# Altium PCB zbook-rf-shields-BLE-P1.PcbDoc
Units mm, origin at the board's own origin, x right, y up, seen from the top; angles counter-clockwise.
Board outline 19 x 27 mm, 4 copper layers (Top Layer, GND, PWR, Bottom Layer), stack 1.597 mm thick; 25 components, 22 nets, 89 pads, 22 vias.
Unrouted connection lines stored in the file: 2.
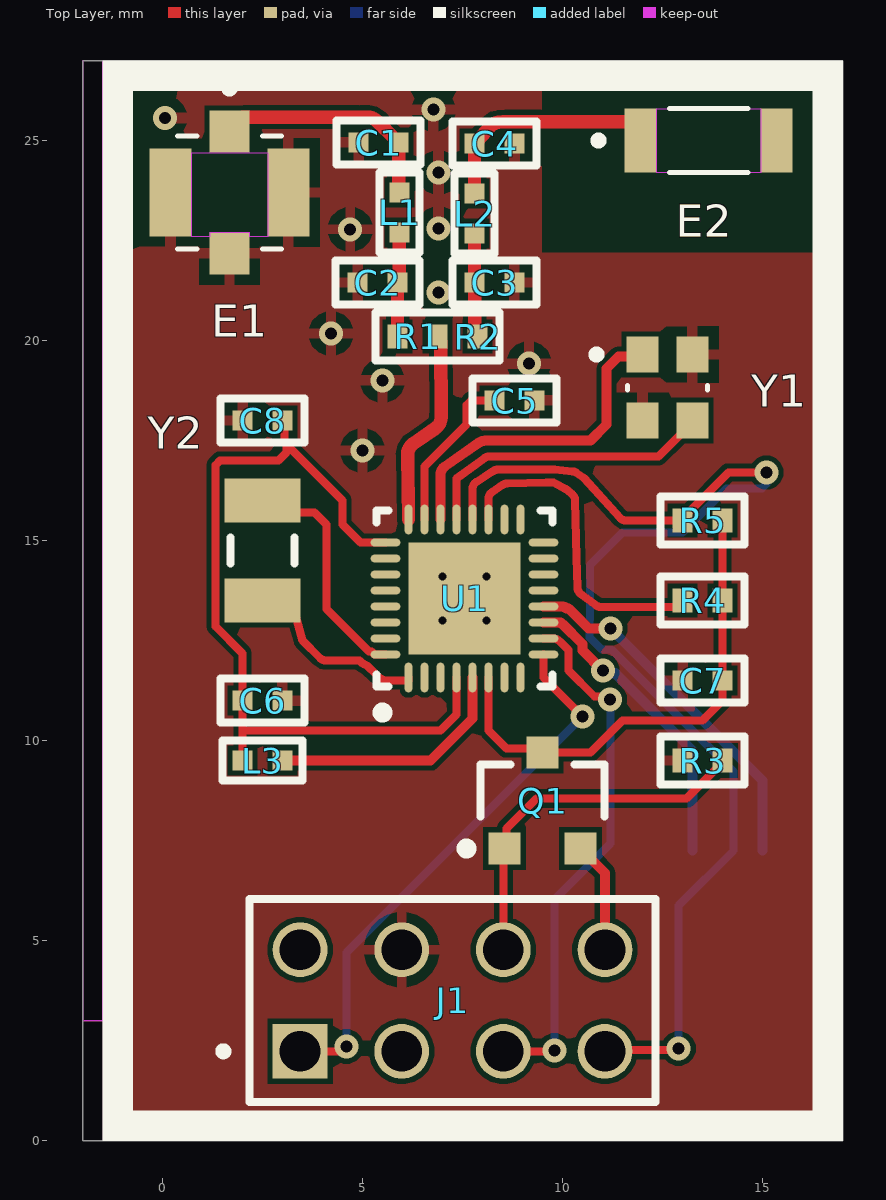
[diagram p0: Top Layer view]
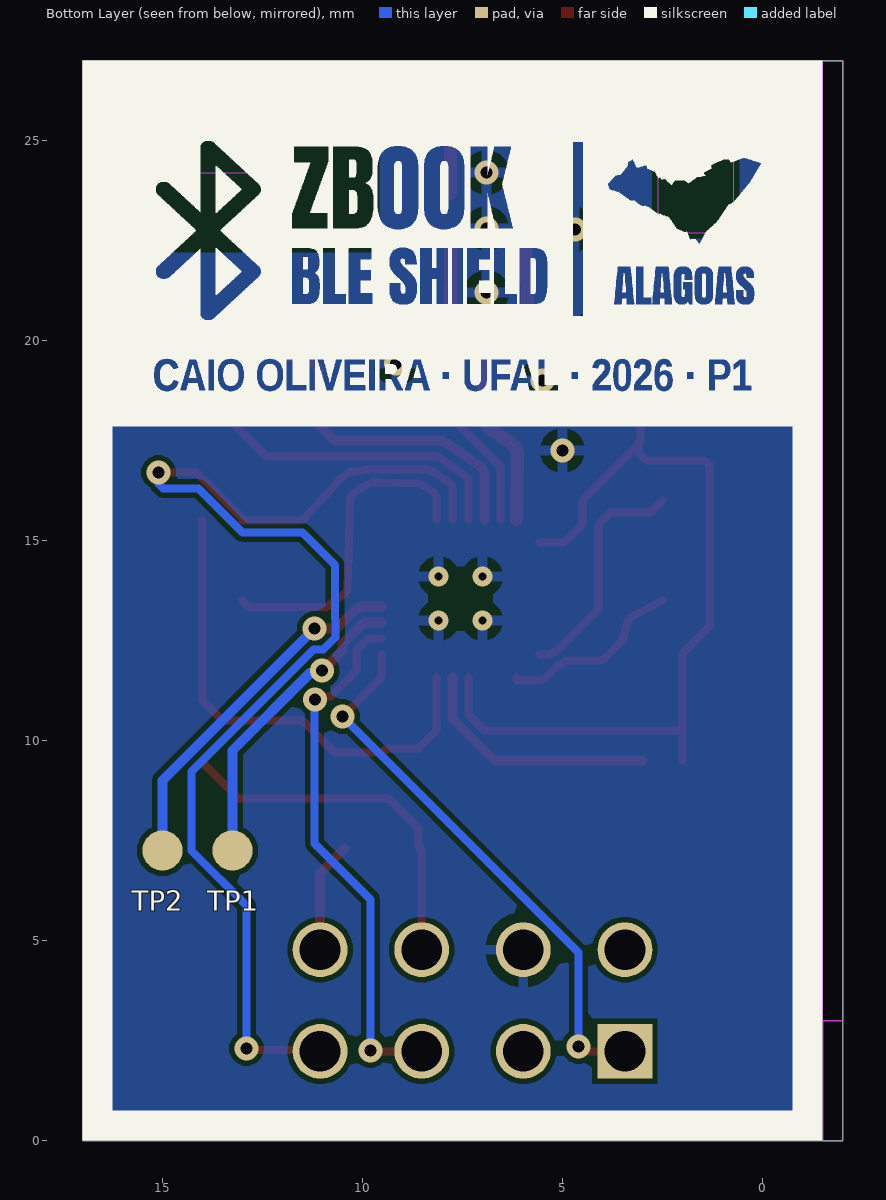
[diagram p1: Bottom Layer view, seen from below]
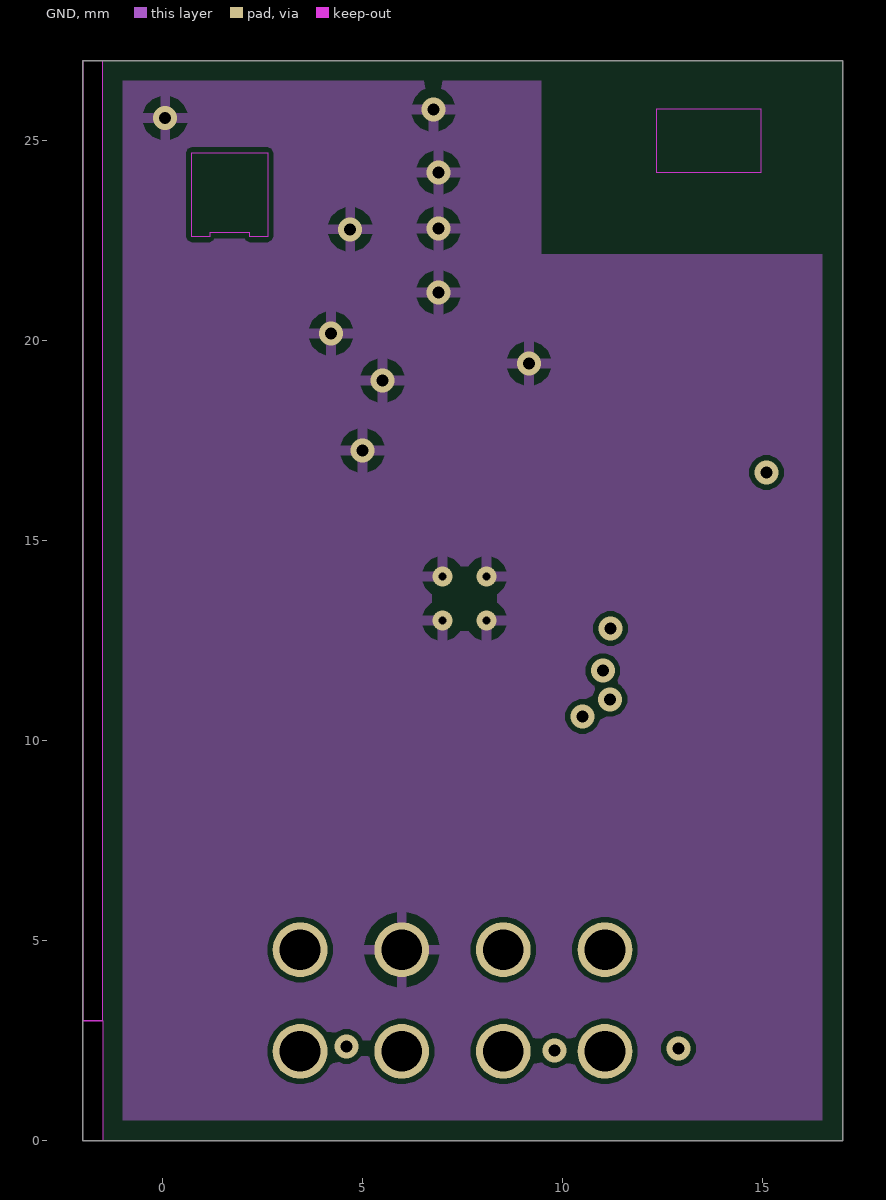
[diagram p2: GND]
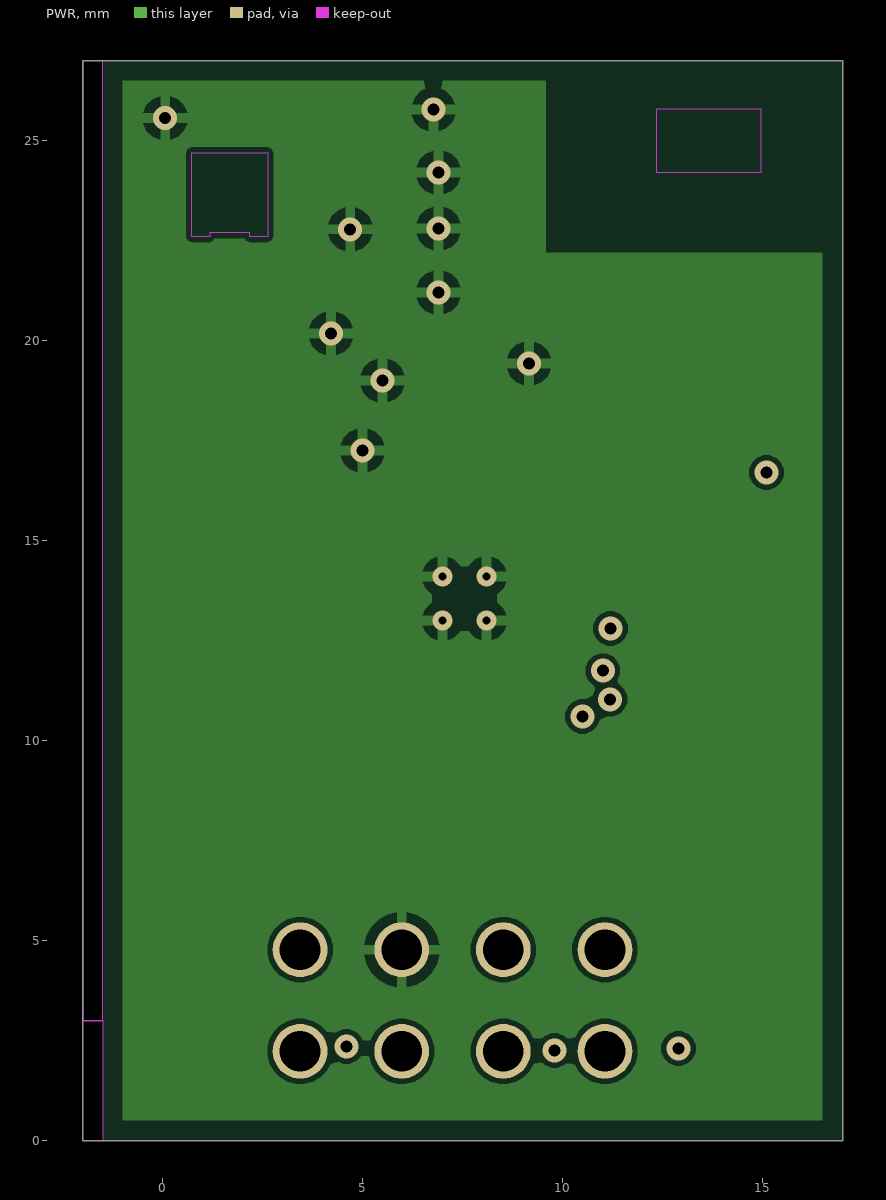
[diagram p3: PWR]
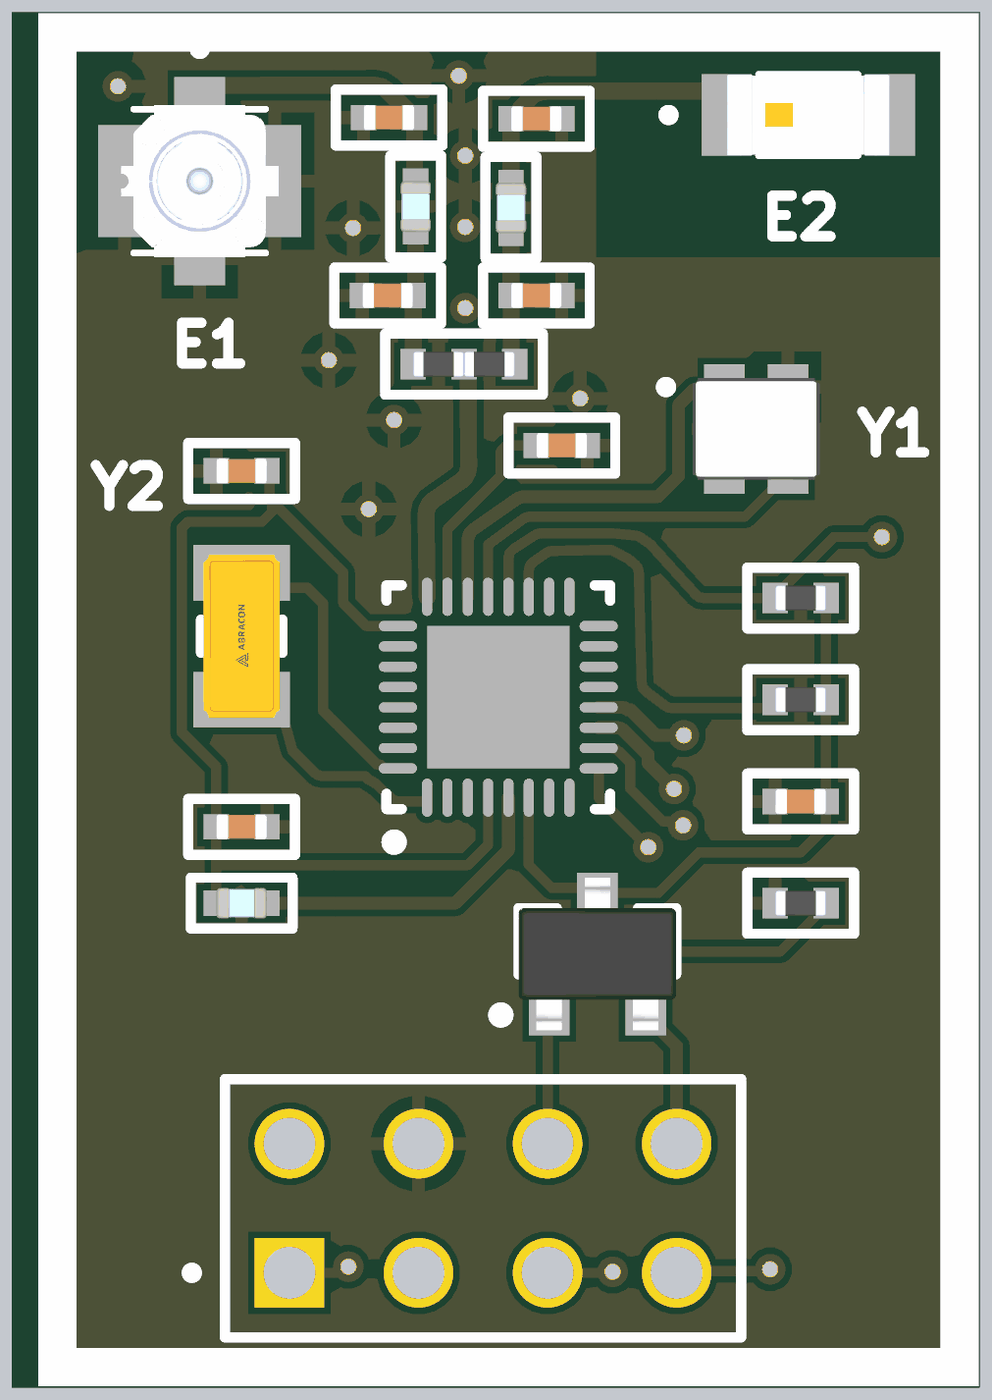
[diagram p4: 3D render of the assembled board from above, using the file's embedded part models]

## Layer stack, top to bottom
Top Solder: solder mask 0.0102, Solder Resist, Dk 3.5
Top Layer: signal copper 0.0175
Dielectric 2: prepreg 0.196, PP-006, Dk 4.74
GND: signal copper 0.035
Dielectric 1: core 1.1, Core-036, Dk 4.6
PWR: signal copper 0.035
Dielectric 3: prepreg 0.196, PP-006, Dk 4.74
Bottom Layer: signal copper 0.0175
Bottom Solder: solder mask 0.0102, Solder Resist, Dk 3.5

## Board outline
-2,0 -2,27 17,27 17,0
cut-out: -1.5,27 -2,27 -2,3 -1.5,3 -2,3 -1.5,3
cut-out: -1.5,0 -2,0 -2,3 -1.5,3

## Design rules (kind name [scope] priority, off if disabled: settings)
BoardOutlineClearance [All] p1: gap=0.5 ignorepadtopadclearanceinfootprint=FALSE except(0: Arc-SplitContinuation Track-SplitContinuation SMDPad-SplitContinuation THPad-SplitContinuation Via-SplitContinuation Fill-SplitContinuation Poly-SplitContinuation Region-SplitContinuation Text-SplitContinuation)
Clearance [All] p1: gap=0.127 ignorepadtopadclearanceinfootprint=FALSE
ComponentClearance [All] p1 off: gap=0.254 collisioncheckmode=3 verticalgap=0.254 showdistances=FALSE
PolygonConnect [All] p1: connectstyle=Relief reliefconductorwidth=0.254 reliefentries=4 polygonreliefangle="90 Angle" airgapwidth=0.254
ReturnPath ReturnPath_IMP50 [InNetClass('IMP50')] p1: impedanceprofileid={6CFC5C45-C699-41E6-A985-3513A1A8B816} _gaplimit=0 _useantipads=TRUE
RoutingVias [All] p1: holewidth=0.3 width=0.6 viastyle="Through Hole" minholewidth=0.3 minwidth=0.6 maxholewidth=0.3 maxwidth=0.6
SolderMaskExpansion Tenting_Vias [IsVia] p1: expansion=0 istentingtop=TRUE
SolderMaskExpansion [All] p2: expansion=0 istentingtop=FALSE
SupplyNets "Schematic Supply Nets_2" [InNet('GND')] p1: voltage=0.000
SupplyNets "Schematic Supply Nets_1" [InNet('VCC')] p2: voltage=0.000
SupplyNets "Schematic Supply Nets" [InNet('VDC')] p3: voltage=0.000
Width Width_IMP50 [InNetClass('IMP50')] p1: maxlimit=0.335 minlimit=0.217 preferedwidth=0.335 toplayer_minwidth=0.335 midlayer1_maxwidth=0.217 midlayer1_prefwidth=0.217 midlayer2_maxwidth=0.217 midlayer2_prefwidth=0.217 bottomlayer_minwidth=0.335 impedanceprofiledriven=TRUE impedanceprofileid={6CFC5C45-C699-41E6-A985-3513A1A8B816} impedanceprofilevalue=50.000000 minimp=50.000000 maximp=50.000000 favimp=50.000000
Width [All] p2: maxlimit=2 minlimit=0.2 preferedwidth=0.2 minimp=50.000000 maximp=50.000000 favimp=50.000000
29 further rules are at their usual default settings.

## Classes and differential pairs
net class IMP50: NetC1_2 NetC2_2 NetC3_2 NetC4_2 NetR1_1
component class "[03] - BLE MODULE AND CONNECTIONS": C1 C2 C3 C4 C5 C6 C7 C8 E1 E2 J1 L1 L2 L3 Q1 R3 R4 R5 TP1 TP2 U1 Y2

## Components (designator, comment, footprint, x,y, rotation, side; value= is the part's Value field where it differs from the comment)
C1 "NC" C0402#1 5.4,24.95 r0 top
C2 "NC" C0402#1 5.375,21.45 r0 top
C3 "NC" C0402#2 8.3,21.45 r180 top
C4 "NC" C0402#2 8.3,24.925 r180 top
C5 "0.47 uF" C0402#1 8.8,18.5 r180 top
C6 "0.1 uF" C0402#1 2.5,11 r180 top
C7 "2.2 uF" C0402#1 13.5,11.5 r0 top
C8 "4.7 uF" C0402#1 2.5,18 r0 top
E1 "20441-001E-01" IPEX_20441-001E-01 1.675,23.7 r180 top
E2 "2450AT18A0100001E" XCVR_2450AT18A0100001E 13.65,25 r0 top
J1 "MTSW-104-07-T-D-240-LL" SAMTEC_MTSW-104-07-T-D-240-LL 7.25,3.5 r0 top
L1 "0R" L0402 5.925,23.2 r270 top
L2 "0R" L0402 7.8,23.175 r90 top
L3 "10uH" L0402 2.5,9.5 r180 top
Q1 "AO3401A" AO-SOT-23-3L_V 9.5,8.5 r90 top
R1 "0 R" R0402#1 6.375,20.1 r180 top
R2 "0 R" R0402#2 7.375,20.1 r0 top
R3 "10K" R0402#1 13.5,9.5 r0 top
R4 "10K" R0402#1 13.5,13.5 r0 top
R5 "10K" R0402#1 13.5,15.5 r0 top
TP1 "TestPoint" "Test Point" 15,7.25 r90 top
TP2 "TestPoint" "Test Point" 13.25,7.25 r90 top
U1 "CH592X" QFN40P400X400X80_HS-33N 7.55,13.55 r90 top
Y1 "ABM10-32.000MHZ-D30-T3" XTAL_ABM10-32.000MHZ-D30-T3 12.625,18.825 r0 top
Y2 "ABS07-32.768KHZ-T" FP-ABS07-MFG 2.5,14.75 r90 top

## Footprints (in the part's own frame and the unit in brackets; to place one, negate y for a bottom-side part, rotate by r counter-clockwise, add the part's x,y. Pads: shape width x height; smd on the part's side, far side on the other; paste and mask are expansions set on the pad)
AO-SOT-23-3L_V [mm] "SOT23, 3-Leads, Body 3.1x1.8mm, Pitch 0.95mm"
  rect 0.8x0.8 smd: 1(-1.2,0.95) 2(-1.2,-0.95) 3(1.2,0)
  silkscreen extent -1.32,-1.55 0.9,2.02, body extent -1.5,-1.55 1.5,1.55, height 1.25
C0402#1 [mm]
  rect 0.5x0.5 smd: 1(-0.5,0) 2(0.5,0)
  silkscreen extent -1.05,-0.55 1.05,0.55, body extent -0.5,-0.25 0.5,0.25, height 0.51
C0402#2 [mm]
  rect 0.5x0.5 smd mask+0: 1(-0.5,0)
  rect 0.5x0.5 smd: 2(0.5,0)
  silkscreen extent -1.05,-0.55 1.05,0.55, body extent -0.5,-0.25 0.5,0.25, height 0.51
FP-ABS07-MFG [mm]
  rect 1.1x1.9 smd paste+0 mask+0: 1(-1.25,0) 2(1.25,0)
  silkscreen extent -0.32,-0.8 0.33,0.8, body extent -1.9,-1.05 1.9,1.05, height 0.25
IPEX_20441-001E-01 [mm]
  rect 1x1.05 smd: 1(0,-1.525) G2(0,1.525)
  rect 1.05x2.2 smd: G1(-1.475,0) G3(1.475,0)
  Keep-Out Layer region: 0.95,-1 -0.95,-1 -0.95,1.1 -0.5,1.1 -0.5,1 0.5,1 0.5,1.1 0.95,1.1
  silkscreen extent -1.3,-2.7 1.3,1.41, body extent -1.5,-1.55 1.5,1.55, height 1.25
L0402 [mm]
  rect 0.5x0.5 smd: 1(-0.5,0) 2(0.5,0)
  silkscreen extent -1,-0.5 1,0.5, body extent -0.5,-0.3 0.5,0.3, height 0.51
QFN40P400X400X80_HS-33N [mm] "QFN, 32-Leads, Body 4,00x4,00mm, Pitch 0,40mm, Thermal Pad 2,80x2,80mm, IPC Medium Density"
  rect 2.8x2.8 smd: 0(0,0)
  oval 0.75x0.2 smd: 1(-1.975,1.4) 2(-1.975,1) 3(-1.975,0.6) 4(-1.975,0.2) 5(-1.975,-0.2) 6(-1.975,-0.6) 7(-1.975,-1) 8(-1.975,-1.4) 17(1.975,-1.4) 18(1.975,-1) 19(1.975,-0.6) 20(1.975,-0.2) 21(1.975,0.2) 22(1.975,0.6) 23(1.975,1) 24(1.975,1.4)
  oval 0.2x0.75 smd: 9(-1.4,-1.975) 10(-1,-1.975) 11(-0.6,-1.975) 12(-0.2,-1.975) 13(0.2,-1.975) 14(0.6,-1.975) 15(1,-1.975) 16(1.4,-1.975) 25(1.4,1.975) 26(1,1.975) 27(0.6,1.975) 28(0.2,1.975) 29(-0.2,1.975) 30(-0.6,1.975) 31(-1,1.975) 32(-1.4,1.975)
  silkscreen extent -2.97,-2.2 2.2,2.2, body extent -2.54,-2.54 2.54,2.54, height 0.25
R0402#1 [mm]
  rect 0.5x0.6 smd: 1(-0.5,0) 2(0.5,0)
  silkscreen extent -1.05,-0.6 1.05,0.6, body extent -0.5,-0.25 0.5,0.25, height 0.41
R0402#2 [mm]
  rect 0.5x0.6 smd: 2(0.5,0)
  silkscreen extent -1.05,-0.6 1.05,0.6, body extent -0.5,-0.25 0.5,0.25, height 0.41
SAMTEC_MTSW-104-07-T-D-240-LL [mm]
  rect 1.37x1.37 / inner round 1.37 / far side rect 1.37x1.37 hole 1.02: 01(-3.81,-1.27)
  round 1.37 hole 1.02: 02(-3.81,1.27) 03(-1.27,-1.27) 04(-1.27,1.27) 05(1.27,-1.27) 06(1.27,1.27) 07(3.81,-1.27) 08(3.81,1.27)
  silkscreen extent -5.83,-2.54 5.08,2.54
"Test Point" [mm]
  round 1 smd far side paste-1: 1(0,0)
XCVR_2450AT18A0100001E [mm]
  rect 0.8x1.6 smd: 1(-1.7,0) 2(1.7,0)
  Keep-Out Layer region: 1.3,-0.8 -1.3,-0.8 -1.3,0.8 1.3,0.8
  Keep-Out Layer region: 1.3,-0.8 -1.3,-0.8 -1.3,0.8 1.3,0.8
  silkscreen extent -2.85,-0.8 0.98,0.8, body extent -1.6,-0.8 1.6,0.8, height 1.4
XTAL_ABM10-32.000MHZ-D30-T3 [mm]
  rect 0.8x0.9 smd: 1(-0.625,0.825) 2(-0.625,-0.825) 3(0.625,-0.825) 4(0.625,0.825)
  silkscreen extent -1.87,-0.06 1,0.92, body extent -1.25,-1 1.25,1, height 0.7

## Part data
C1 C2 C3 C4: library part MLCC_0402_NC, "MLCC - NC 0402", Manufacturer Part Number 1=DNP, .Mounting=SMT, .PCBChecked=NO, .SCHChecked=NO
C5: library part "MLCC_0402_0.47 uF", "MLCC - 0.47 uF 0402", .Mounting=SMT, .PCBChecked=NO, .SCHChecked=NO
C6: library part "MLCC_0402_0.1 uF", "MLCC - 0.1 uF 0402", .Mounting=SMT, .PCBChecked=NO, .SCHChecked=NO
C7: library part "MLCC_0402_2.2 uF", "MLCC - 2.2 uF 0402", .Mounting=SMT, .PCBChecked=NO, .SCHChecked=NO
C8: library part "MLCC_0402_4.7 uF", "MLCC - 4.7 uF 0402", .Mounting=SMT, .PCBChecked=NO, .SCHChecked=NO
E1: "CONN - U.FL RF Receptacle SMD", Frequency=9GHz, Manufacturer 1=I-PEX, Max Operating Temperature=90°C, Min Operating Temperature=-40°C, Supplier Part Number=5378-20441-001E-01DKR-ND, Voltage Rating=60V, .Mounting=SMT, .PCBChecked=NO, .SCHChecked=NO, Category="RF / Coaxial Connectors", ComponentLink1Description=https://datasheet.octopart.com:443/20441-001E-01-I-PEX-datasheet-180039539.pdf?src-supplier=IHS, ComponentLink1URL=https://datasheet.octopart.com:443/20441-001E-01-I-PEX-datasheet-180039539.pdf?src-supplier=IHS, Contact Material="Gold, Nickel", Export Control Classification Number (ECCN) Code=EAR99, Fastening Type=Snap, Gender=Male, Harmonized Tariff Schedule (HTS) Code=8536.69.40.10, Height=1.45mm, Impedance=50Ω, Lifecycle Status=Production, Manufacturer Part Number 1=20441-001E-01, Number of Contacts=1, Number of Positions=1, Orientation=Straight, Pricing="1=1,04, 10=0,882, 25=0,8268, 50=0,7872, 100=0,7495, 250=0,70256, 500=0,669, 1000=0,63705, 2500=0,59717 (USD)", REACH SVHC=Unaffected, RoHS=Compliant, Stock=35351, Supplier=DigiKey
E2: "ANTENNA - 2.4GHz Chip 1206", Clock Frequency=2.5GHz, Manufacturer 1="Johanson Technology", Max Operating Temperature=125°C, Min Operating Temperature=-40°C, Power Rating=2W, Supplier Part Number=712-2450AT18A0100001EDKR-ND, .Mounting=SMT, .PCBChecked=NO, .SCHChecked=NO, Bandwidth=100MHz, Category="RF Antennas", ComponentLink1Description=https://datasheet.octopart.com:443/2450AT18A0100001E-Johanson-datasheet-137404838.pdf?src-supplier=Upverter, ComponentLink1URL=https://datasheet.octopart.com:443/2450AT18A0100001E-Johanson-datasheet-137404838.pdf?src-supplier=Upverter, ComponentLink2Description=https://datasheet.octopart.com:443/2450AT18A0100001E-Johanson-datasheet-101575227.pdf?src-supplier=Newark, ComponentLink2URL=https://datasheet.octopart.com:443/2450AT18A0100001E-Johanson-datasheet-101575227.pdf?src-supplier=Newark, Country of Origin=Taiwan, Export Control Classification Number (ECCN) Code=EAR99, Gain=0.5dB, Harmonized Tariff Schedule (HTS) Code=8529.10, Height=1.4mm, Impedance=50Ω, Introduction Date=2024-07-01, Lifecycle Status=Production, Manufacturer Part Number 1=2450AT18A0100001E, Number of Bands=1, Pricing="1=0,52, 10=0,446, 25=0,4196, 100=0,384, 250=0,36244, 500=0,3472, 1000=0,3328 (USD)", REACH SVHC=Unaffected, Return Loss=9.5dB, RoHS=Compliant, Stock=203443, Supplier=DigiKey
J1: "CONN - Header 2x4 2.54mm THT", Manufacturer 1=Samtec, Manufacturer Lifecycle Status=PRODUCTION, Supplier Part Number=612-MTSW-104-07-T-D-240-LL-ND, .Mounting=THT, .PCBChecked=NO, .SCHChecked=NO, Category="Headers and Wire Housings", ComponentLink1Description=https://datasheet.octopart.com:443/MTSW-104-07-T-D-240-LL-Samtec-datasheet-97134619.pdf?src-supplier=Samtec, ComponentLink1URL=https://datasheet.octopart.com:443/MTSW-104-07-T-D-240-LL-Samtec-datasheet-97134619.pdf?src-supplier=Samtec, ComponentLink2Description=https://sigma.octopart.com:443/97134620/technical_drawing/Samtec-MTSW-104-07-T-D-240-LL.pdf?src-supplier=Samtec, ComponentLink2URL=https://sigma.octopart.com:443/97134620/technical_drawing/Samtec-MTSW-104-07-T-D-240-LL.pdf?src-supplier=Samtec, ComponentLink3Description=https://datasheet.octopart.com:443/MTSW-104-07-T-D-240-LL-Samtec-datasheet-118493423.pdf?src-supplier=Electro+Sonic, ComponentLink3URL=https://datasheet.octopart.com:443/MTSW-104-07-T-D-240-LL-Samtec-datasheet-118493423.pdf?src-supplier=Electro+Sonic, ComponentLink4Description=https://datasheet.octopart.com:443/MTSW-104-07-T-D-240-LL-Samtec-datasheet-86819181.pdf?src-supplier=Sager+Electronics, ComponentLink4URL=https://datasheet.octopart.com:443/MTSW-104-07-T-D-240-LL-Samtec-datasheet-86819181.pdf?src-supplier=Sager+Electronics, ComponentLink5Description=https://datasheet.octopart.com:443/MTSW-104-07-T-D-240-LL-Samtec-datasheet-166224765.pdf?src-supplier=Sager+Electronics, ComponentLink5URL=https://datasheet.octopart.com:443/MTSW-104-07-T-D-240-LL-Samtec-datasheet-166224765.pdf?src-supplier=Sager+Electronics, ComponentLink6Description=https://datasheet.octopart.com:443/MTSW-104-07-T-D-240-LL-Samtec-datasheet-158401026.pdf?src-supplier=Sager+Electronics, ComponentLink6URL=https://datasheet.octopart.com:443/MTSW-104-07-T-D-240-LL-Samtec-datasheet-158401026.pdf?src-supplier=Sager+Electronics, ComponentLink7Description=https://datasheet.octopart.com:443/MTSW-104-07-T-D-240-LL-Samtec-datasheet-151470471.pdf?src-supplier=Sager+Electronics, ComponentLink7URL=https://datasheet.octopart.com:443/MTSW-104-07-T-D-240-LL-Samtec-datasheet-151470471.pdf?src-supplier=Sager+Electronics, ComponentLink8Description=https://datasheet.octopart.com:443/MTSW-104-07-T-D-240-LL-Samtec-datasheet-180249843.pdf?src-supplier=JRH+Electronics, ComponentLink8URL=https://datasheet.octopart.com:443/MTSW-104-07-T-D-240-LL-Samtec-datasheet-180249843.pdf?src-supplier=JRH+Electronics, ComponentLink9Description=https://datasheet.octopart.com:443/MTSW-104-07-T-D-240-LL-Samtec-datasheet-104272029.pdf?src-supplier=Newark, ComponentLink9URL=https://datasheet.octopart.com:443/MTSW-104-07-T-D-240-LL-Samtec-datasheet-104272029.pdf?src-supplier=Newark, Contact Material=Bronze, Contact Plating=Tin, Gender=Male, Lead Free="Lead Free", Lead Pitch=2.54mm, Lifecycle Status=Production, Manufacturer Part Number 1=MTSW-104-07-T-D-240-LL, Mounting Technology="Through Hole", Number of Contacts=8, Number of Rows=2, Packaging=Bulk, Pitch=2.54mm, Pricing="1=0,56 (USD)", Radiation Hardening=No, RoHS=Compliant, Supplier=DigiKey, Termination=Solder
L1 L2: library part Inductor_0402, "INDUCTOR - 0R 0402", .Mounting=SMT, .PCBChecked=NO, .SCHChecked=NO
L3: library part Inductor_0402_10uH, "INDUCTOR - 10uH - 0402", .Mounting=SMT, .PCBChecked=NO, .SCHChecked=NO
Q1: "MOSFET - P-Ch -30V SOT-23", Case/Package=TO-236-3, Continuous Drain Current (ID)=4A, Drain to Source Breakdown Voltage=-30V, Drain to Source Resistance=50mΩ, Gate to Source Voltage (Vgs)=12V, Input Capacitance=1.2nF, Manufacturer 1="Alpha & Omega Semiconductor", Max Junction Temperature (Tj)=150°C, Max Power Dissipation=1.4W, Min Breakdown Voltage=30V, Min Operating Temperature=-55°C, Supplier Part Number=785-1001-6-ND, Threshold Voltage=-900mV, .Mounting=SMT, .PCBChecked=NO, .SCHChecked=NO, Category=MOSFETs, ComponentLink1Description=https://datasheet.octopart.com:443/AO3401A-Alpha-%26-Omega-Semiconductor-datasheet-11631723.pdf?src-supplier=IHS, ComponentLink1URL=https://datasheet.octopart.com:443/AO3401A-Alpha-%26-Omega-Semiconductor-datasheet-11631723.pdf?src-supplier=IHS, ComponentLink2Description=https://sigma.octopart.com:443/138895710/technical_drawing/Alpha-%26-Omega-Semiconductor-AO3401A.pdf?src-supplier=Upverter, ComponentLink2URL=https://sigma.octopart.com:443/138895710/technical_drawing/Alpha-%26-Omega-Semiconductor-AO3401A.pdf?src-supplier=Upverter, ComponentLink3Description=https://sigma.octopart.com:443/140150677/technical_drawing/Alpha-%26-Omega-Semiconductor-AO3401A.pdf?src-supplier=Alpha+%26+Omega+Semiconductor+SCT, ComponentLink3URL=https://sigma.octopart.com:443/140150677/technical_drawing/Alpha-%26-Omega-Semiconductor-AO3401A.pdf?src-supplier=Alpha+%26+Omega+Semiconductor+SCT, ComponentLink4Description=https://datasheet.octopart.com:443/AO3401A-Alpha-%26-Omega-Semiconductor-datasheet-14060796.pdf?src-supplier=iiiC, ComponentLink4URL=https://datasheet.octopart.com:443/AO3401A-Alpha-%26-Omega-Semiconductor-datasheet-14060796.pdf?src-supplier=iiiC, Country of Origin="Mainland China", Drain to Source Voltage (Vds)=-30V, Export Control Classification Number (ECCN) Code=EAR99, Height=1.25mm, Introduction Date=2007-04-10, Lead Free="Lead Free", Lifecycle Status=Production, Manufacturer Part Number 1=AO3401A, Max Operating Temperature=150°C, Mounting Technology="Surface Mount", Number of Channels=1, Number of Elements=1, Number of Terminals=3, Pins=3, Power Dissipation=1.4W, Pricing="1=0,52, 10=0,322, 50=0,2332, 100=0,2043, 500=0,15316 (USD)", Radiation Hardening=No, Rds On Max=44mΩ, REACH SVHC=Unaffected, RoHS=Compliant, Schedule B="8541290080, 8541290080|8541290080|8541290080|8541290080|8541290080", Stock=369049, Supplier=DigiKey, Turn-Off Delay Time=41ns, Turn-On Delay Time=6.5ns
R1 R2: library part Resistor_0402_0R, "RESISTOR - 0R 0402", .Mounting=SMT, .PCBChecked=NO, .SCHChecked=NO
R3 R4 R5: library part Resistor_0402_10K, "RESISTOR - 10K 0402", .Mounting=SMT, .PCBChecked=NO, .SCHChecked=NO
TP1 TP2: library part Test_Point, "MECH - Test Points", .Mounting=N/A, .PCBChecked=NO, .SCHChecked=NO
U1: "MODULE - CH592X BLE 5.4 SoC QFN-32", Manufacturer 1=WCH, .Mounting=SMT, .PCBChecked=NO, .SCHChecked=NO, Manufacturer Part Number 1=CH592X
Y1: "Crystal 32MHz ±20ppm (Tol) ±30ppm (Stability) 10pF FUND 70Ohm 4-Pin Ultra Mini-CSMD T/R", Case/Package=CSMD, ESR (Equivalent Series Resistance)=70Ω, Frequency=32MHz, Frequency Stability=30ppm, Frequency Tolerance=0.002%, Load Capacitance=10pF, Manufacturer=Abracon, Max Operating Temperature=85°C, Min Operating Temperature=-40°C, Supplier Part Number=535-10936-6-ND, Category=Crystals, China RoHS=Compliant, ComponentLink1Description=https://datasheet.octopart.com:443/ABM10-32.000MHZ-D30-T3-Abracon-datasheet-182204619.pdf?src-supplier=IHS, ComponentLink1URL=https://datasheet.octopart.com:443/ABM10-32.000MHZ-D30-T3-Abracon-datasheet-182204619.pdf?src-supplier=IHS, ComponentLink2Description=https://datasheet.octopart.com:443/ABM10-32.000MHZ-D30-T3-Abracon-datasheet-41232962.pdf?src-supplier=JRH+Electronics, ComponentLink2URL=https://datasheet.octopart.com:443/ABM10-32.000MHZ-D30-T3-Abracon-datasheet-41232962.pdf?src-supplier=JRH+Electronics, ComponentLink3Description=https://datasheet.octopart.com:443/ABM10-32.000MHZ-D30-T3-Abracon-datasheet-37124829.pdf?src-supplier=Newark, ComponentLink3URL=https://datasheet.octopart.com:443/ABM10-32.000MHZ-D30-T3-Abracon-datasheet-37124829.pdf?src-supplier=Newark, ComponentLink4Description=https://datasheet.octopart.com:443/ABM10-32.000MHZ-D30-T3-Abracon-datasheet-13380592.pdf?src-supplier=Sager+Electronics, ComponentLink4URL=https://datasheet.octopart.com:443/ABM10-32.000MHZ-D30-T3-Abracon-datasheet-13380592.pdf?src-supplier=Sager+Electronics, ComponentLink5Description=https://datasheet.octopart.com:443/ABM10-32.000MHZ-D30-T3-Abracon-datasheet-11045593.pdf?src-supplier=Sager+Electronics, ComponentLink5URL=https://datasheet.octopart.com:443/ABM10-32.000MHZ-D30-T3-Abracon-datasheet-11045593.pdf?src-supplier=Sager+Electronics, ComponentLink6Description=https://datasheet.octopart.com:443/ABM10-32.000MHZ-D30-T3-Abracon-datasheet-8882520.pdf?src-supplier=Sager+Electronics, ComponentLink6URL=https://datasheet.octopart.com:443/ABM10-32.000MHZ-D30-T3-Abracon-datasheet-8882520.pdf?src-supplier=Sager+Electronics, ComponentLink7Description=https://datasheet.octopart.com:443/ABM10-32.000MHZ-D30-T3-Abracon-datasheet-8456701.pdf?src-supplier=Sager+Electronics, ComponentLink7URL=https://datasheet.octopart.com:443/ABM10-32.000MHZ-D30-T3-Abracon-datasheet-8456701.pdf?src-supplier=Sager+Electronics, ComponentLink8Description=https://datasheet.octopart.com:443/ABM10-32.000MHZ-D30-T3-Abracon-datasheet-8326102.pdf?src-supplier=Sager+Electronics, ComponentLink8URL=https://datasheet.octopart.com:443/ABM10-32.000MHZ-D30-T3-Abracon-datasheet-8326102.pdf?src-supplier=Sager+Electronics, ComponentLink9Description=https://datasheet.octopart.com:443/ABM10-32.000MHZ-D30-T3-Abracon-datasheet-5401317.pdf?src-supplier=Sager+Electronics, ComponentLink9URL=https://datasheet.octopart.com:443/ABM10-32.000MHZ-D30-T3-Abracon-datasheet-5401317.pdf?src-supplier=Sager+Electronics, ComponentLink10Description=https://datasheet.octopart.com:443/ABM10-32.000MHZ-D30-T3-Abracon-datasheet-128558403.pdf?src-supplier=X-ON, ComponentLink10URL=https://datasheet.octopart.com:443/ABM10-32.000MHZ-D30-T3-Abracon-datasheet-128558403.pdf?src-supplier=X-ON, ComponentLink11Description=https://sigma.octopart.com:443/141159849/technical_drawing/Abracon-ABM10-32.000MHZ-D30-T3.pdf?src-supplier=Abracon+SCT, ComponentLink11URL=https://sigma.octopart.com:443/141159849/technical_drawing/Abracon-ABM10-32.000MHZ-D30-T3.pdf?src-supplier=Abracon+SCT, ComponentLink12Description=http://sigma.octopart.com:80/conflict_mineral_statement/Abracon-company-27.pdf?src-supplier=Compliance+Statements, ComponentLink12URL=http://sigma.octopart.com:80/conflict_mineral_statement/Abracon-company-27.pdf?src-supplier=Compliance+Statements, Country of Origin=Taiwan, Depth=2mm, ESR=70Ω, Height=700µm, Height - Seated (Max)=500µm, Introduction Date=2015-04-21, Lead Free="Lead Free", Length=2.5mm, Lifecycle Status=Production, Manufacturer Part Number=ABM10-32.000MHZ-D30-T3, Mounting Technology="Surface Mount", Part Series=ABM10, Pins=4, Pricing="1=1,11, 10=0,964, 25=0,912, 50=0,8742, 100=0,838, 250=0,79248, 500=0,7597, 1000=0,72829 (USD)", REACH SVHC=Unaffected, RoHS=Compliant, Schedule B="8541600060, 8541600060|8541600060, 8541600060|8541600060|8541600060, 8541600060|8541600060|8541600060|8541600060", Stock=20033, Supplier=DigiKey, Termination=SMD/SMT, Tolerance=0.002%, Width=2mm
Y2: library part CMP-0447-00001-4, "XTAL - 32.768 kHz 12.5pF SMD", Case/Package=CSMD, ESR (Equivalent Series Resistance)=70kR, Frequency=32.768kHz, Frequency Tolerance=20ppm, Load Capacitance=12.5pF, Manufacturer 1=Abracon, Max Operating Temperature=85°C, Min Operating Temperature=-40°C, Operating Frequency="32.768 kHz", Package Quantity=3000, .Mounting=SMT, .PCBChecked=NO, .SCHChecked=NO, Depth=1.5mm, Height=0.9mm, Lead Free="Lead Free", Length=3.2mm, Manufacturer Part Number 1=ABS07-32.768KHZ-T, Number of Pins=2, Packaging="Tape and Reel", Radiation Hardening=No, REACH SVHC="No SVHC", RoHS Compliant=Yes, Series=ABS07, Series Resistance=70kR, Termination=SMD/SMT, Tolerance=20ppm, Width=1.5mm

## Via types
v1: diameter 0.6, hole 0.3, Top Layer to Bottom Layer, tented both sides, 18 vias
v2: diameter 0.5, hole 0.2, Top Layer to Bottom Layer, tented both sides, 4 vias

## Nets (pads, with @x,y where several pads share a name; then routed paths per layer and width w, separated by ;. In a path a pad name is that pad's centre, name@x,y a point inside that pad or via, vN(x,y) a via of type N, cw(c..) or ccw(c..) an arc to the next point about the centre after c; other vN are vias at no path point)
+3V3: J1.08 Q1.2 | length 2.8
  Top Layer w0.254: Q1.2 11.06,6.69 J1.08
BOOT_N: J1.07 R5.1 U1.20 | length 31.4
  Top Layer w0.2: U1.20 7.75,16.291 ; J1.07 11.095,2.265 12.865,2.265 v1(12.9,2.3) ; 11.44,15.566 10.543,16.557 10.343,16.695 ccw(c10.229,16.531) 10.248,16.73 9.8,16.773 8.385,16.773 ccw(c8.385,16.573) 8.283,16.745 8.253,16.727 ; v1(15.1,16.7) 14.15,16.7 13,15.55 R5.1 11.589,15.5 ; 7.75,16.291 cw(c7.95,16.291) 7.841,16.459 ; 7.75,16.291 cw(c7.95,16.291) 7.841,16.459 ; 7.841,16.459 8.247,16.723 ; 8.247,16.723 cw(c8.356,16.555) 8.253,16.727 ; 8.247,16.723 cw(c8.356,16.555) 8.253,16.727 ; 11.589,15.5 cw(c11.589,15.7) 11.441,15.565 ccw(c11.589,15.7) 11.589,15.5
  Bottom Layer w0.2: v1(12.9,2.3) 12.9,5.872 14.273,7.245 14.273,9.226 11.226,12.273 10.982,12.273 10.673,12.582 10.673,13.018 10.687,13.032 10.687,14.387 11.5,15.2 13,15.2 14.1,16.3 14.983,16.3 15.1,16.417 v1(15.1,16.7)
GND: C1.1 C2.1 C3.1 C4.1 C5.1 C6.1 C7.1 C8.1 E1.G1 E1.G2 E1.G3 J1.04 R3.1 U1.0 Y1.2 Y1.4
  other v1: 5,17.25 5.5,19 9.16,19.425 4.214,20.176 6.9,21.2 4.693,22.779 6.9,22.8 6.9,24.2 0.065,25.564 6.773,25.773
  other v2: 7,13 8.1,13 7,14.1 8.1,14.1
NetC1_2: C1.2 E1.1 L1.1 | length 6.1
  Top Layer w0.335: E1.1 2.008,25.583 5.126,25.585 ; 5.363,25.487 5.818,25.033 C1.2 5.902,24.868 5.902,23.783 L1.1 ; 5.126,25.585 cw(c5.126,25.25) 5.362,25.488 ccw(c5.126,25.25) 5.126,25.585
NetC2_2: C2.2 L1.2 R1.2 | length 2.6
  Top Layer w0.335: R1.2 5.875,21.367 C2.2 5.922,21.532 5.922,22.617 L1.2
NetC3_2: C3.2 L2.1 R2.2 | length 2.6
  Top Layer w0.335: L2.1 7.8,22.592 C3.2 7.805,21.367 7.805,20.233 R2.2
NetC4_2: C4.2 E2.1 L2.2 | length 6.2
  Top Layer w0.335: L2.2 C4.2 7.883,25.008 8.183,25.344 ; E2.1 11.717,25.469 8.549,25.469 ; 8.183,25.344 cw(c8.433,25.12) 8.394,25.453 ; 8.183,25.344 cw(c8.433,25.12) 8.394,25.453 ; 8.394,25.453 8.516,25.468 ; 8.516,25.467 cw(c8.55,25.175) 8.549,25.469 ; 8.516,25.467 cw(c8.55,25.175) 8.549,25.469
NetC5_2: C5.2 U1.23 | length 4
  Top Layer w0.2: U1.23 6.55,16.85 7.6,17.9 7.6,18.383 7.717,18.5 C5.2
NetR1_1: R1.1 U1.24 | length 5.3
  Top Layer w0.335: U1.24 6.127,17.146 ; R1.1 6.958,19.967 6.966,18.083 cw(c6.631,18.081) 6.822,17.805 6.272,17.427 ; 6.127,17.147 cw(c6.462,17.151) 6.272,17.427 ; 6.127,17.147 cw(c6.462,17.151) 6.272,17.427
NetR4_1: R4.1 U1.19 | length 8.6
  Top Layer w0.2: U1.19 8.15,15.8 8.15,16.045 cw(c8.35,16.045) 8.237,16.21 8.501,16.391 cw(c8.614,16.226) 8.61,16.426 9.599,16.446 9.601,16.446 cw(c9.603,16.246) 9.603,16.446 9.775,16.446 10.084,16.283 ; 10.243,16.158 10.119,16.26 ; 10.372,13.821 10.35,14.575 10.315,16.008 ; R4.1 12.85,13.336 10.96,13.336 ; 10.119,16.26 ccw(c9.991,16.106) 10.085,16.283 cw(c9.991,16.106) 10.119,16.26 ; 10.315,16.008 ccw(c10.115,16.004) 10.243,16.157 cw(c10.115,16.004) 10.315,16.008 ; 10.452,13.667 cw(c10.572,13.827) 10.372,13.82 ccw(c10.572,13.827) 10.452,13.667 ; 10.452,13.667 10.84,13.376 ; 10.841,13.376 ccw(c10.96,13.536) 10.96,13.336 ; 10.841,13.376 ccw(c10.96,13.536) 10.96,13.336
NetTP1_1: TP1.1 U1.12 | length 9
  Top Layer w0.254: U1.12 9.979,13.35 cw(c9.979,13.179) 10.1,13.3 10.152,13.3 10.652,12.8 v1(11.2,12.8)
  Bottom Layer w0.254: v1(11.2,12.8) 15,9 TP1.1
NetTP2_1: TP2.1 U1.11 | length 7.6
  Top Layer w0.254: U1.11 9.898,12.95 cw(c9.898,12.793) 10.009,12.904 10.5,12.413 10.5,12.254 v1(11.008,11.746)
  Bottom Layer w0.254: v1(11.008,11.746) 11.074,11.68 11.319,11.68 13.25,9.749 TP2.1
NetU1_1: U1.1 Y2.1 | length 4.6
  Top Layer w0.2: Y2.1 3.35,13.05 3.5,12.5 3.941,12.059 ccw(c4.083,12.2) 4.083,12 4.925,12 4.972,11.953 ccw(c5.113,12.095) 5.019,11.918 5.104,11.874 cw(c5.011,11.697) 5.149,11.841 ; 5.15,11.841 5.444,11.556 ccw(c5.583,11.7) 5.583,11.5 6.15,11.5 U1.1
NetU1_21: U1.21 Y1.3 | length 7.5
  Top Layer w0.2: U1.21 7.35,16.55 8.047,17.061 cw(c8.165,16.9) 8.165,17.1 9.8,17.1 10.624,17.103 12.403,17.103 13.25,17.95 Y1.3
NetU1_22: U1.22 Y1.1 | length 8.2
  Top Layer w0.25: U1.22 6.95,16.645 cw(c7.2,16.645) 7.056,16.849 7.888,17.43 cw(c8.029,17.223) 7.895,17.434 7.896,17.435 7.932,17.458 cw(c8.065,17.246) 7.953,17.469 cw(c8.065,17.246) 8.068,17.496 10.696,17.496 11.1,17.9 11.1,19.3 11.4,19.6 11.95,19.6 Y1.1
NetU1_32: U1.32 Y2.2 | length 5.9
  Top Layer w0.2: Y2.2 2.8,15.7 3.8,15.7 4.1,15.4 4.1,13.288 5.165,12.223 5.227,12.223 5.3,12.15 U1.32
PWR_EN: J1.06 Q1.1 R3.2 | length 9.2
  Top Layer w0.2: J1.06 8.52,7.27 Q1.1 8.6,7.35 8.6,7.8 9.35,8.55 13.1,8.55 14,9.45 R3.2
UART_RX: J1.01 U1.9 | length 13.9
  Top Layer w0.2: J1.01 4.6,2.23 v1(4.6,2.35) ; U1.9 9.525,11.575 v1(10.5,10.6)
  Bottom Layer w0.2: v1(4.6,2.35) 4.6,4.7 v1(10.5,10.6)
UART_TX: J1.05 U1.10 | length 13.2
  Top Layer w0.2: J1.05 9.8,2.23 v1(9.8,2.25) ; U1.10 9.759,12.55 cw(c9.759,12.301) 9.935,12.477 10.146,12.266 10.146,11.754 10.793,11.107 11.109,11.107 v1(11.185,11.03)
  Bottom Layer w0.2: v1(9.8,2.25) 9.8,6.025 11.2,7.425 11.2,11.015 v1(11.185,11.03)
VCC: C7.2 Q1.3 R4.2 R5.2 U1.6 | length 12.4
  Top Layer w0.2: U1.6 8.15,10.25 8.6,9.8 9.4,9.8 Q1.3 10.7,9.7 11.5,10.5 13.5,10.5 14,11 C7.2 R4.2 R5.2
VDC: C6.2 C8.2 L3.2 U1.4 U1.25 | length 20.7
  Top Layer w0.2: L3.2 2,10.25 ; C8.2 3.05,17.95 3.05,17.45 3.1,17.4 ; 3.1,17.45 3.1,17.4 ; U1.25 4.95,14.95 4.5,15.4 4.5,16 3.1,17.4 ; U1.4 7.35,10.65 6.95,10.25 2,10.25 ; 2,10.25 C6.2 2,12.179 1.323,12.856 1.323,16.883 1.44,17 2.9,17 3.1,17.2 3.1,17.4
VSW: L3.1 U1.5 | length 6.2
  Top Layer w0.254: L3.1 6.701,9.5 7.75,10.549 U1.5
pads on no net: E2.2 J1.02 J1.03 U1.2 U1.3 U1.7 U1.8 U1.13 U1.14 U1.15 U1.16 U1.17 U1.18 U1.26 U1.27 U1.28 U1.29 U1.30 U1.31

## Polygon pours and split planes (outlines as drawn)
GND on GND "GND_L02_P002" (solid, remove dead copper, pour order 2): -2,27 17,27 17,0 -2,0
GND on PWR "GND_L03_P003" (solid, remove dead copper, pour order 3): -2,27 17,27 17,0 -2,0
GND on Top Layer "GND_L01_P006" (solid, remove dead copper, pour order 6): -2,27 17,27 17,0 -2,0
GND on Bottom Layer "GND_L04_P007" (solid, remove dead copper, pour order 7): -2,27 17,27 17,0 -2,0

## Other copper
Top Layer:
  pour cut-out: 16.9,27 16.9,22.2 9.475,22.2 9.475,27
  pour cut-out: 17,0.75 17,0 -1.5,0 -1.5,0.75
  pour cut-out: -0.75,27 -0.75,0 -1.5,0 -1.5,27
  pour cut-out: 17,27 17,0 16.25,0 16.25,27
  pour cut-out: 17,27 17,26.25 -1.5,26.25 -1.5,27
GND:
  pour cut-out: 16.898,26.955 16.898,22.155 9.473,22.155 9.473,26.955
  pour cut-out: 17,27 17,22.2 9.575,22.2 9.575,27
PWR:
  pour cut-out: 17,27 17,22.2 9.575,22.2 9.575,27
Bottom Layer:
  pour cut-out: 17,27 17,22.2 9.575,22.2 9.575,27

## Silkscreen, mask and mechanical layers (free items; w line width, h text height)
Top Overlay:
  region: 17,0 17,0.75 -1.5,0.75 -1.5,0
  region: -1.5,27 -0.75,27 -0.75,0 -1.5,0
  region: -1.5,27 -1.5,26.25 17,26.25 17,27
  region: 17,27 17,0 16.25,0 16.25,27
Bottom Overlay:
  drawing of 27 lines, arcs and shapes, not listed